# Altium PCB WizPoE-IO-V001.PcbDoc
Units mm, origin at the board's own origin, x right, y up, seen from the top; angles counter-clockwise.
Board outline 100 x 60 mm, 4 copper layers (Top Layer, Internal Plane 1 (Gnd), Internal Plane 2 (Vcc), Bottom Layer), stack 1.6 mm thick; 80 components, 81 nets, 365 pads, 272 vias.
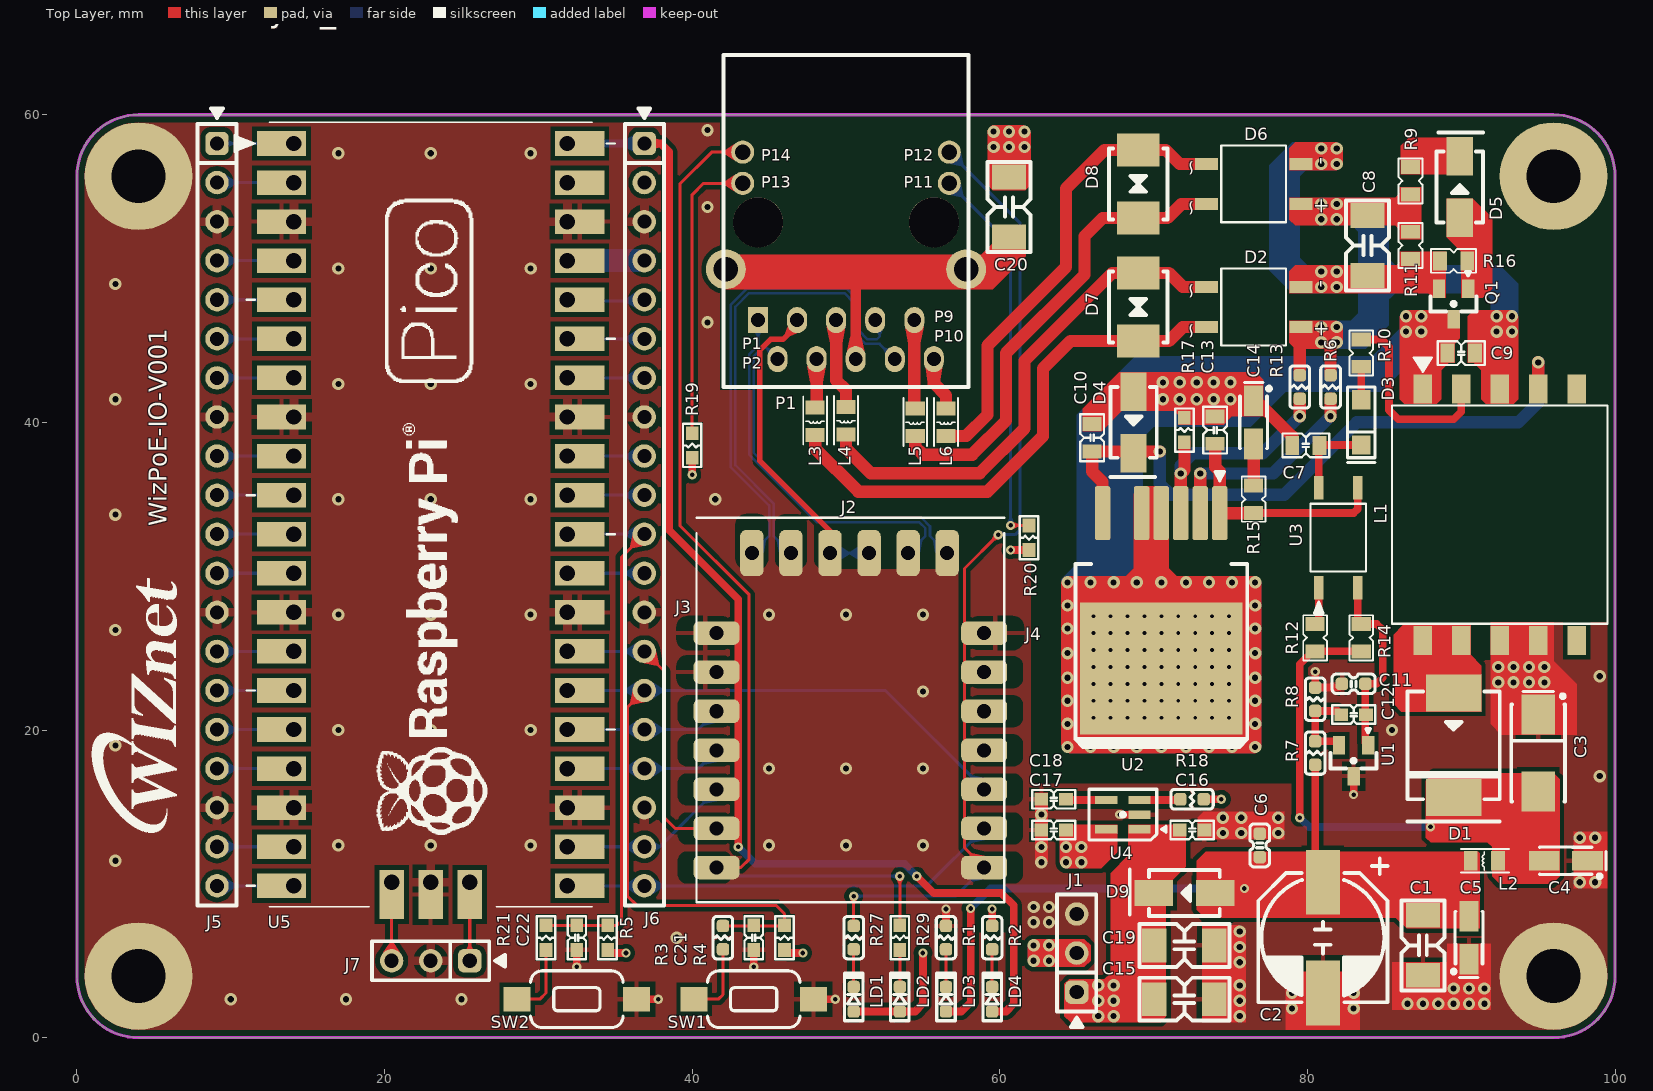
[diagram p0: Top Layer view]
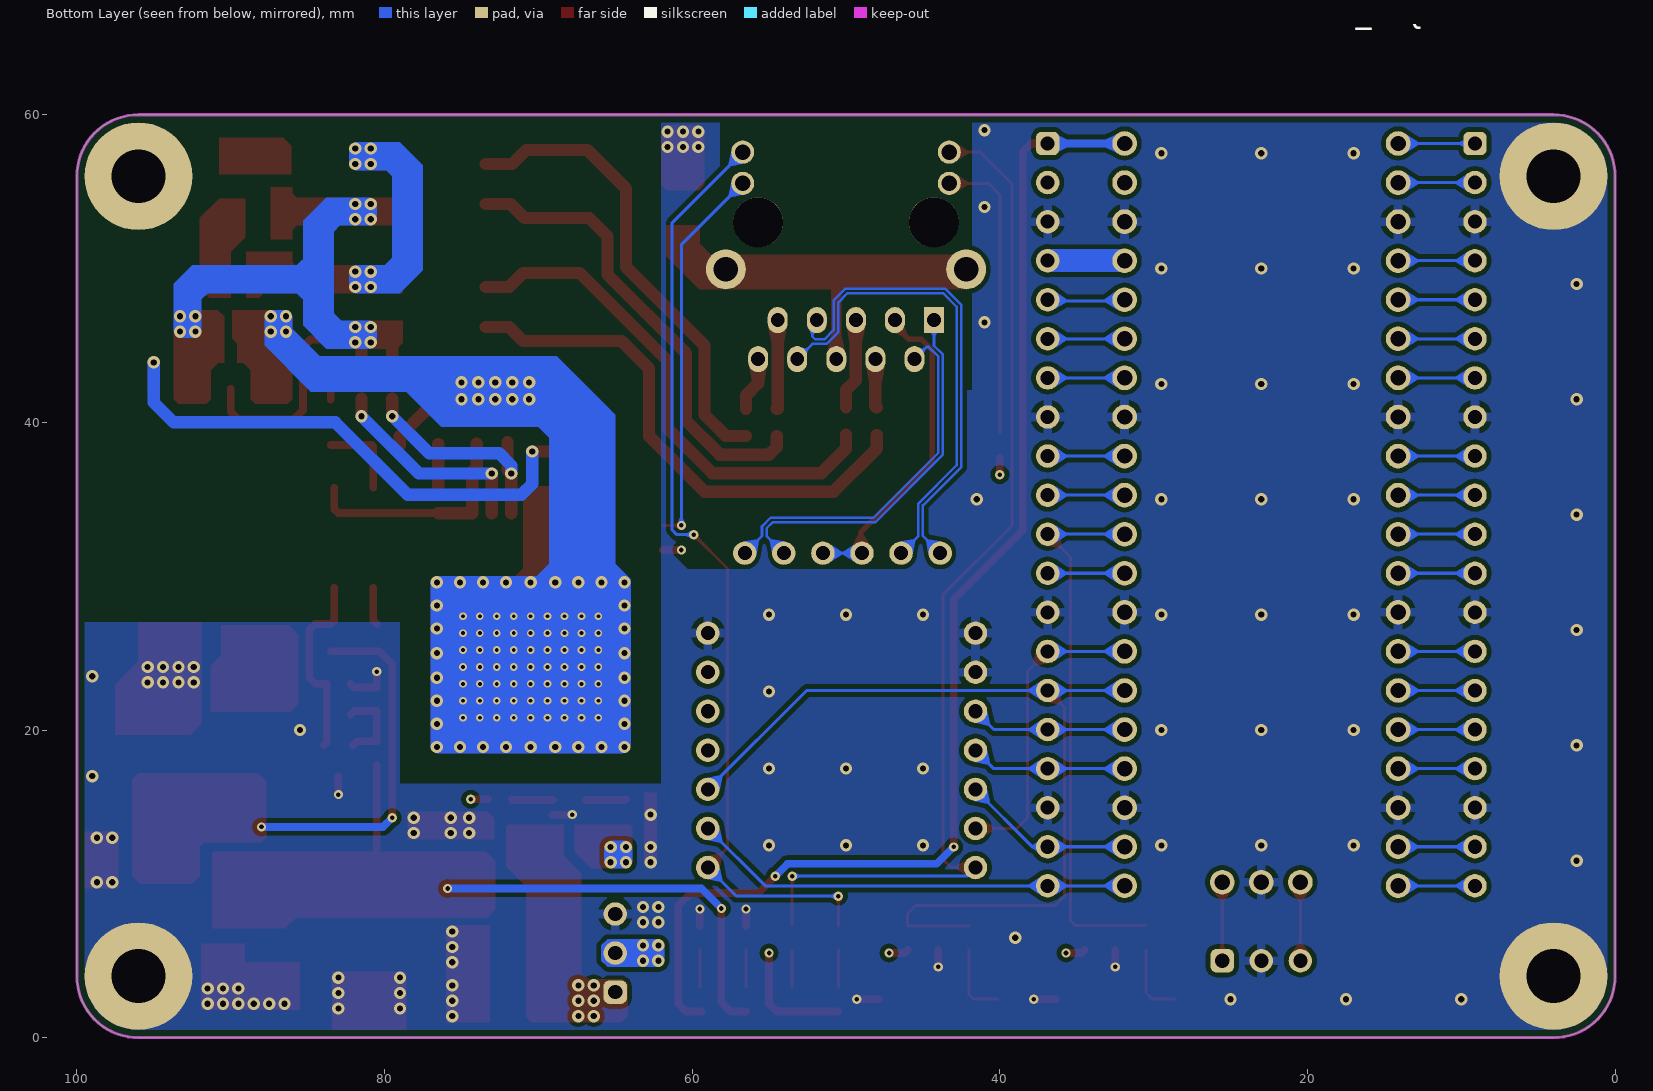
[diagram p1: Bottom Layer view, seen from below]
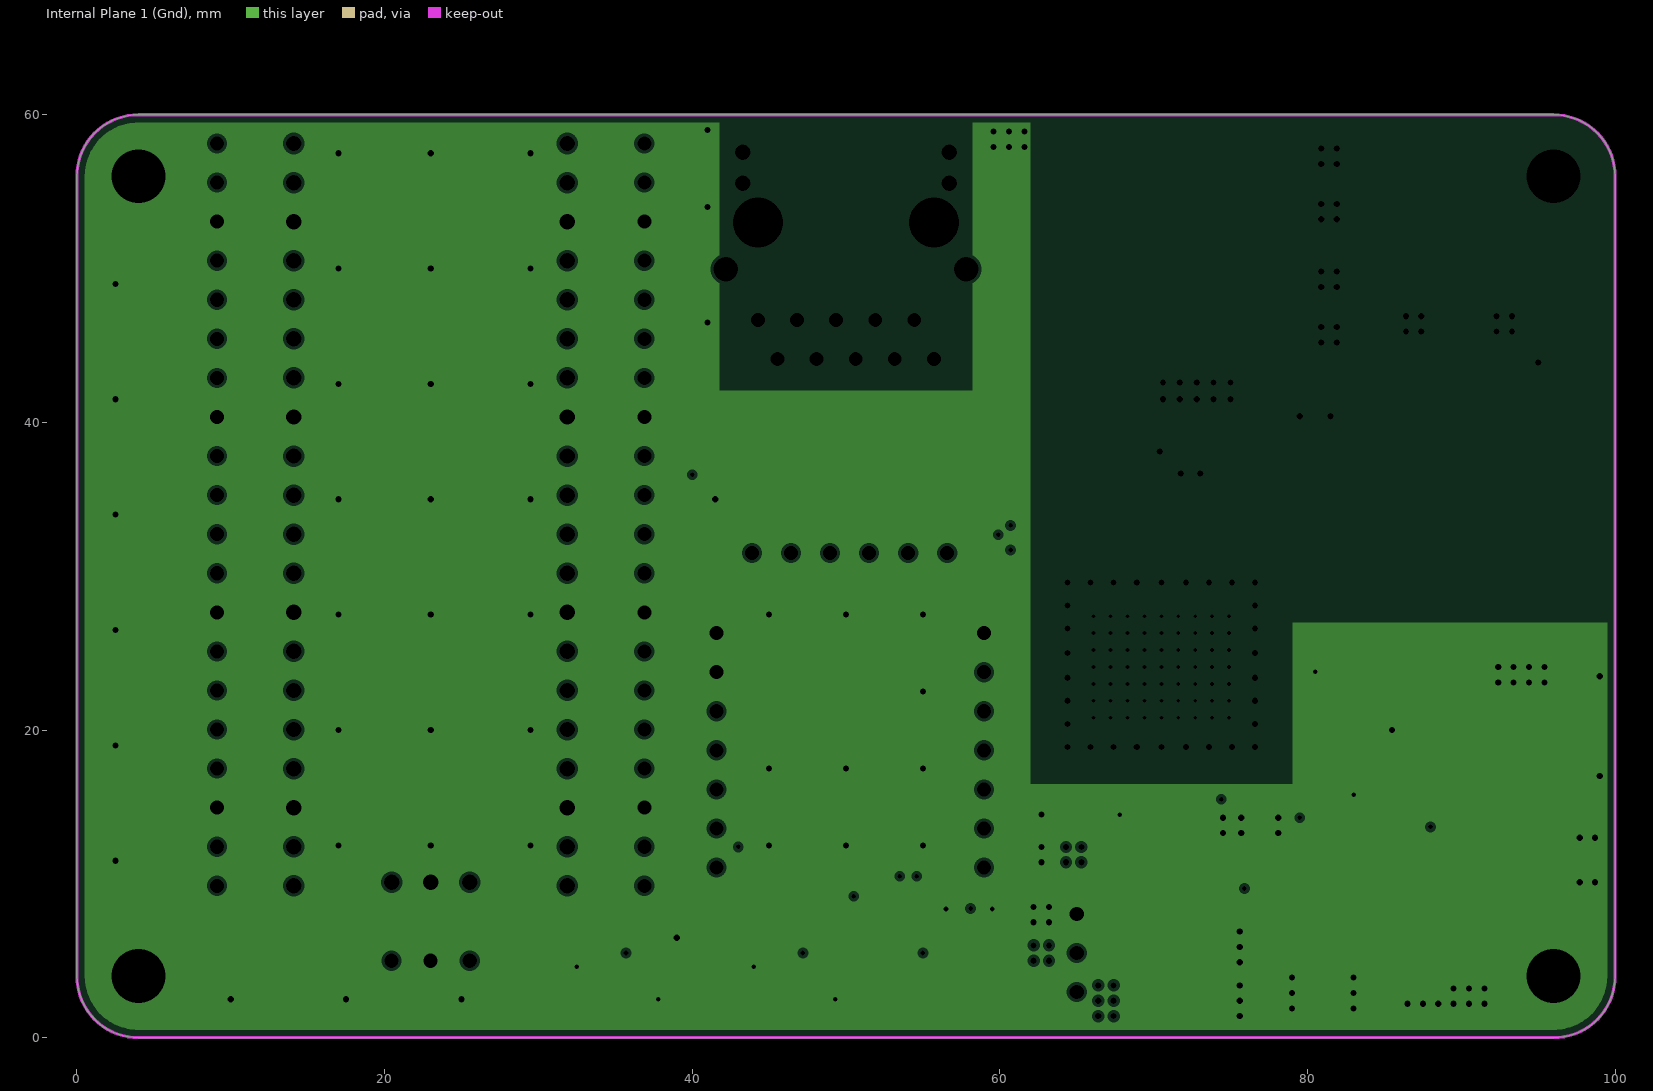
[diagram p2: Internal Plane 1 (Gnd), clearances drawn from the general rule]
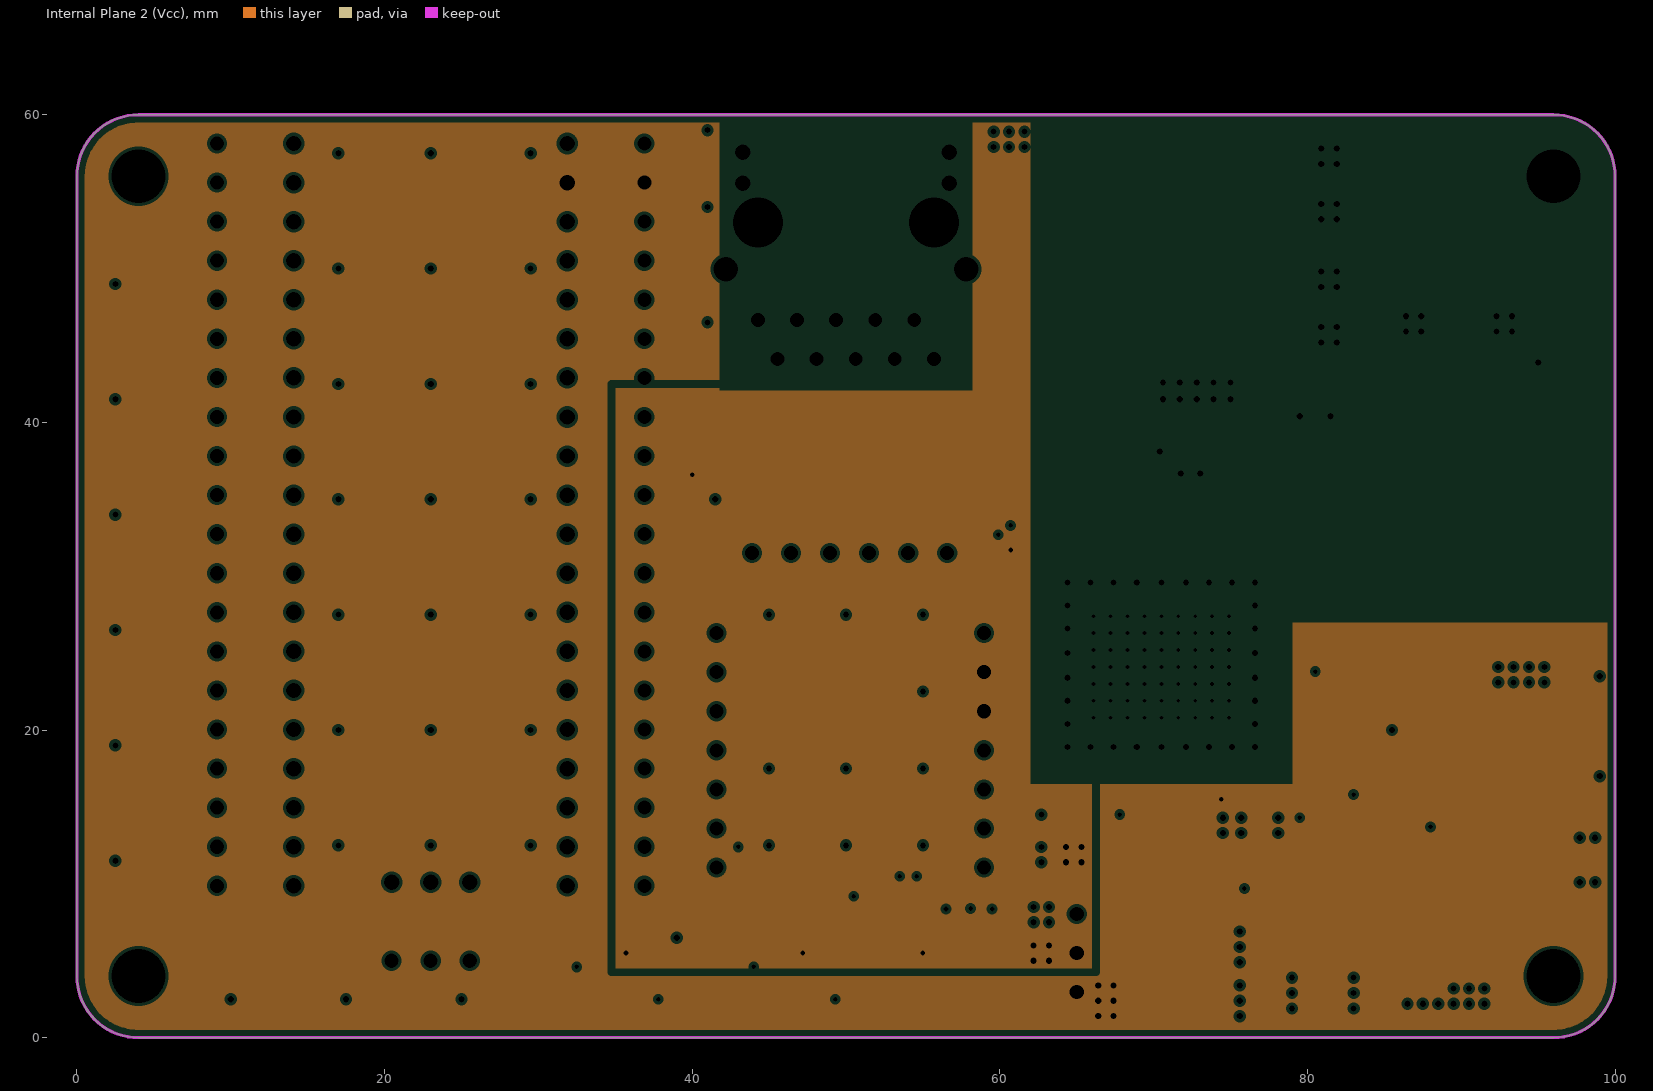
[diagram p3: Internal Plane 2 (Vcc), clearances drawn from the general rule]

## Layer stack, top to bottom
Top Solder: solder mask 0.01, Solder Resist, Dk 3.5
Top Layer: signal copper 0.1
Dielectric1: prepreg 0.4, FR-4, Dk 4.8
Internal Plane 1 (Gnd): plane copper 0.1, net GND
Dielectric 1: prepreg 0.4, PP-006, Dk 4.1
Internal Plane 2 (Vcc): plane copper 0.1, net (Multiple Nets)
Dielectric 2: prepreg 0.4, PP-006, Dk 4.1
Bottom Layer: signal copper 0.1
Bottom Solder: solder mask 0.01, Solder Resist, Dk 3.5

## Board outline
0,4 ccw(c4,4) 4,0 96,0 ccw(c96,4) 100,4 100,56 ccw(c96,56) 96,60 4,60 ccw(c4,56) 0,56

## Design rules (kind name [scope] priority, off if disabled: settings)
BoardOutlineClearance [All] p1: gap=0.5 ignorepadtopadclearanceinfootprint=FALSE
Clearance Pair [InNetClass('Pair')] p1: gap=0.2 ignorepadtopadclearanceinfootprint=FALSE except(0.1: Track-Track; 0.3: Arc-Poly Track-Poly SMDPad-Poly THPad-Poly Via-Poly Fill-Poly Poly-Poly Poly-Region Poly-Text)
Clearance [All] p2: gap=0.2 ignorepadtopadclearanceinfootprint=FALSE except(0.3: Arc-Poly Track-Poly SMDPad-Poly THPad-Poly Via-Poly Fill-Poly Poly-Poly Poly-Region Poly-Text)
DiffPairsRouting [All] p1: maxlimit=0.135 minlimit=0.135 mostfreqgap=0.135 toplayer_minwidth=0.165 toplayer_maxwidth=0.165 toplayer_prefwidth=0.165 bottomlayer_minwidth=0.165 bottomlayer_maxwidth=0.165 bottomlayer_prefwidth=0.165 maxuncoupledlength=15.24
HoleSize [All] p1: absolutevalues=TRUE maxlimit=4.064 minlimit=0.025 maxpercent=80.000 minpercent=20.000
PlaneClearance [All] p1: clearance=0.2
PlaneConnect [All] p1: planeconnectstyle=Direct reliefexpansion=0.508 reliefentries=4 reliefconductorwidth=0.254 reliefairgap=0.254
PolygonConnect [All] p1: thpad.connectstyle=Relief thpad.reliefconductorwidth=0.6 thpad.reliefentries=4 thpad.polygonreliefangle="90 Angle" thpad.airgapwidth=0.35 smdpad.connectstyle=Relief smdpad.reliefconductorwidth=0.3 smdpad.reliefentries=4 smdpad.polygonreliefangle="90 Angle" smdpad.airgapwidth=0.35 via.connectstyle=Direct via.reliefconductorwidth=0.254 via.reliefentries=4 via.polygonreliefangle="90 Angle" via.airgapwidth=0.254
RoutingVias [All] p1: holewidth=0.3 width=0.6 viastyle="Through Hole" minholewidth=0.25 minwidth=0.5 maxholewidth=0.5 maxwidth=0.8
SolderMaskExpansion [All] p1: expansion=0 istentingtop=FALSE
Width [All] p1: maxlimit=2 minlimit=0.1 preferedwidth=0.2 minimp=50.000000 maximp=50.000000 favimp=50.000000
26 further rules are at their usual default settings.

## Classes and differential pairs
net class Pair: RX_N RX_P TX_N TX_P
differential pair TX: +TX_P -TX_N
differential pair RX: +RX_P -RX_N

## Components (designator, comment, footprint, x,y, rotation, side; value= is the part's Value field where it differs from the comment)
C1 "10uF / 16V" CAP-1808 87.5,6 r270 top
C2 "470uF / 16V" CAP-8.3EC 81,6.5 r0 top
C3 "330uF,6V" C6032TT(C) 95,18.5 r270 top
C4 "10uF,10V" C3216TT(A) 96.8,11.5 r180 top
C5 "330uF,6V" C3216TT(A) 90.5,6.5 r90 top
C6 "1uF,10V" CAP-0603#1 76.9,12.5 r270 top
C7 "1uF/50V" CAP-0805 79.9,38.5 r180 top
C8 "CAP-1808" CAP-1808 83.9,51.5 r90 top
C9 "1uF, 100V" CAP-0805 90,44.5 r0 top
C10 "47pF,200V" CAP-0805 66,39 r270 top
C11 "0.33uF,50V" CAP-0603#1 83,23 r180 top
C12 "0.1uF,50V" CAP-0603#2 83,21 r180 top
C13 "0.1uF/50V" CAP-0805 74,39.5 r270 top
C14 "22uF,10V" C3216TT(A) 76.5,40 r270 top
C15 "NC/100uF" CAP-1808 72,2.5 r180 top
C16 "1uF" CAP-0603#2 72.5,13.5 r180 top
C17 "1uF" CAP-0603#2 63.5,13.5 r0 top
C18 "0.1uF" CAP-0603#2 63.5,15.5 r0 top
C19 "NC/100uF" CAP-1808 72,6 r180 top
C20 "1nF/2KV" CAP-1808 60.6,54 r90 top
C21 "0.1uF" CAP-0603#2 44,6.5 r90 top
C22 "0.1uF" CAP-0603#2 32.5,6.5 r90 top
D1 "RBR5L40A" DO-214AB/SMC 89.5,19 r270 top
D2 "MBS6" TO-269AA(MBS) 76.5,47.5 r270 top
D3 "BAV19" SOD-123(1-C,2-A) 83.5,40 r270 top
D4 "SMAJ150A" DO-214AC/SMA 68.7,40 r270 top
D5 "SMAJ12" DO-214AC/SMA 89.9,55.3 r90 top
D6 "MBS6" TO-269AA(MBS) 76.5,55.5 r270 top
D7 "SMBJ58CA (SMB)" DO-214AA/SMB(TVS) 69,47.5 r270 top
D8 "SMBJ58CA (SMB)" DO-214AA/SMB(TVS) 69,55.5 r270 top
D9 "SS14" DO-214AC/SMA 72,9.4 r180 top
J1 "Header_3P" IDC-1X3 65,5.5 r90 top
J2 "2.54mm 1x6 Pin Header DIP" IDC-1X6 56.58,31.5 r180 top
J3 "2.54mm 1x7 Pin Header DIP" IDC-1X7 41.58,26.3 r270 top
J4 "2.54mm 1x7 Pin Header DIP" IDC-1X7-1 58.98,26.3 r270 top
J5 "Pin Header Dip 20x1_2.54mm" IDC-1X20 9.11,58.13 r270 top
J6 "Pin Header Dip 20x1_2.54mm" IDC-1X20 36.89,58.13 r270 top
J7 "Header_3P" IDC-1X3 23,5 r180 top
L1 "SM13117EL" SM13117EL 92.5,34 r0 top
L2 "1uH, 2A" IND-0805 91.5,11.5 r180 top
L3 "MMZ2012S102A" IND-0805 47.995,40.073 r270 top
L4 "MMZ2012S102A" IND-0805 50,40.1 r270 top
L5 "MMZ2012S102A" IND-0805 54.5,40 r270 top
L6 "MMZ2012S102A" IND-0805 56.5,40 r270 top
LD1 "LED-0603" LED-0603-RED 50.5,2.5 r90 top
LD2 "LED-0603" LED-0603-RED 53.5,2.5 r90 top
LD3 "LED-0603" LED-0603-RED 56.5,2.5 r90 top
LD4 "LED-0603" LED-0603-RED 59.5,2.5 r90 top
P1 "RJC-191R" RJC-191R 50,53 r180 top
Q1 "Q-2N7002" SOT23-3L 89.5,47.7 r180 top
R1 "1.5K" RES-0603#1 56.5,6.5 r270 top
R2 "1.5K" RES-0603#1 59.5,6.5 r270 top
R3 "1K" RES-0603#1 42,6.5 r90 top
R4 "4.7k" RES-0603#2 46,6.5 r90 top
R5 "4.7k" RES-0603#2 34.5,6.5 r90 top
R6 "619k, 1%" RES-0603#1 81.5,42.3 r90 top
R7 "10k" RES-0603#1 80.5,18.5 r90 top
R8 "10k" RES-0603#1 80.5,22 r90 top
R9 "50k" RES-2012 86.7,55.7 r270 top
R10 "100R" RES-2012 83.5,44.5 r270 top
R11 "24.9k" RES-2012 86.7,51.5 r90 top
R12 "51R" RES-2012 80.5,26 r90 top
R13 "1M, 1%" RES-0603#1 79.5,42.3 r90 top
R14 "1k" RES-2012 83.5,26 r90 top
R15 "5.1R" RES-2012 76.5,35 r270 top
R16 "250k" RES-2012 89.5,50.5 r0 top
R17 "8.66k, 1%" RES-0603#2 72,39.5 r270 top
R18 "100K" RES-0603#1 72.5,15.5 r180 top
R19 "330R" RES-0603#2 40,38.5 r90 top
R20 "330R" RES-0603#2 61.9,32.5 r270 top
R21 "1K" RES-0603#2 30.5,6.5 r90 top
R27 "1K" RES-0603#1 50.5,6.5 r270 top
R29 "1K" RES-0603#2 53.5,6.5 r270 top
SW1 "ITS-1107(SMD)" IT-1107(SMD) 44,2.5 r0 top
SW2 "ITS-1107(SMD)" IT-1107(SMD) 32.5,2.5 r0 top
U1 "TL431ID" SOT23-3L 83,18 r180 top
U2 "DPA423-426" TO-263-7C 70.5,27.5 r180 top
U3 "PC357" PC357 82,32.5 r0 top
U4 "LM8805SF5-33V" SOT-23-5L 68,14.5 r180 top
U5 "PICO" PICO 23,34 r0 top

## Footprints (in the part's own frame and the unit in brackets; to place one, negate y for a bottom-side part, rotate by r counter-clockwise, add the part's x,y. Pads: shape width x height; smd on the part's side, far side on the other; paste and mask are expansions set on the pad)
C3216TT(A) [mm]
  rect 2x1.25 smd: 1(-1.4,0) 2(1.4,0)
  silkscreen extent -2.6,-0.9 1.7,1.12, body extent -1.6,-0.8 1.59,0.8
C6032TT(C) [mm]
  rect 2.6x2.2 smd: 1(-2.5,0) 2(2.5,0)
  silkscreen extent -4,-1.75 3.15,1.75, body extent -3,-1.6 3,1.6, height 2.51
CAP-8.3EC [mm]
  rect 2.2x4.2 smd: 1(0,-3.6) 2(0,3.6)
  silkscreen extent -4.2,-4.2 4.2,5.15, body extent -4.12,-4.65 4.18,4.65, height 10.31
CAP-0603#1 [mil] "Ceramic CAP 0603(1608)"
  rrect50% 32x32 smd: 1(-30,0) 2(30,0)
  silkscreen extent -55,-25 55,25, body extent -37,-16 37,16, height 32
CAP-0603#2 [mil] "Ceramic CAP 0603(1608)"
  rect 35.04x32.28 smd: 1(-31.5,0) 2(31.5,0)
  silkscreen extent -55,-24 55,24, body extent -37,-16 37,16, height 32
CAP-0805 [mil]
  rect 36x49 smd: 1(-35,0)
  rect 35.43x49 smd: 2(35,0)
  silkscreen extent -60,-30 60,30, body extent -39,-25 40,25, height 31
CAP-1808 [mm] "Ceramic CAP 1808(4520)"
  rect 1.6x2.2 smd: 1(-1.95,0) 2(1.95,0)
  silkscreen extent -2.92,-1.4 2.92,1.4, body extent -2.25,-1.02 2.25,1.01, height 2
DO-214AA/SMB(TVS) [mm]
  rect 2.159x2.743 smd: 1(-2.21,0) 2(2.21,0)
  silkscreen extent -2.3,-1.9 2.3,1.9, body extent -2.71,-1.8 2.69,1.8, height 2.27
DO-214AB/SMC [mm]
  rect 2.4x3.6 smd: 1(-3.4,0) 2(3.4,0)
  silkscreen extent -3.5,-3 4.95,3, body extent -3.98,-2.95 3.97,2.95, height 2.3
DO-214AC/SMA [mm]
  rect 2.5x1.7 smd: 1(-2,0) 2(2,0)
  silkscreen extent -2.3,-1.52 3.56,1.5, body extent -2.46,-1.27 2.47,1.27, height 2
IDC-1X3 [mil]
  rrect50% 60x60 hole 36: 1(-100,0)
  round 60 hole 36: 2(0,0) 3(100,0)
  silkscreen extent -190,-50 150,50, body extent -149,-49 151,51, height 336
IDC-1X6 [mil] "6-Way 2.54 mm Male Header"
  round 60 hole 36: 1(0,0) 2(100,0) 3(200,0) 4(300,0) 5(400,0) 6(500,0)
  rrect50% 60x118.11 smd: 1(0,0) 1(0,0) 2(100,0) 3(200,0) 4(300,0) 5(400,0) 6(500,0)
  body extent -49,-49 551,51, height 336
IDC-1X7 [mil]
  round 60 hole 36: 1(0,0) 2(100,0) 3(200,0) 4(300,0) 5(400,0) 6(500,0) 7(600,0)
  rrect50% 60x118.11 smd: 1(0,0) 1(0,0) 2(100,0) 3(200,0) 4(300,0) 5(400,0) 6(500,0) 7(600,0)
  body extent -49,-49 651,51, height 336
IDC-1X7-1 [mil]
  round 60 hole 36: 1(0,0) 2(100,0) 3(200,0) 4(300,0) 5(400,0) 6(500,0) 7(600,0)
  rrect50% 60x118.11 smd: 1(0,0) 1(0,0) 2(100,0) 3(200,0) 4(300,0) 5(400,0) 6(500,0) 7(600,0)
  body extent -49,-49 651,51, height 336
IDC-1X20 [mil]
  rrect50% 60x60 hole 36: 1(0,0)
  round 60 hole 36: 2(100,0) 3(200,0) 4(300,0) 5(400,0) 6(500,0) 7(600,0) 8(700,0) 9(800,0) 10(900,0) 11(1000,0) 12(1100,0) 13(1200,0) 14(1300,0) 15(1400,0) 16(1500,0) 17(1600,0) 18(1700,0) 19(1800,0) 20(1900,0)
  silkscreen extent -90,-50 1950,50, body extent -49,-49 1951,51, height 336
IND-0805 [mil]
  rect 36x49 smd: 1(-35,0)
  rect 35.43x49 smd: 2(35,0)
  Top Layer pour cut-out: -15,25 -15,-25 15,-25 15,25
  silkscreen extent -63,-30 60,30, body extent -39,-24 39,24, height 37
IT-1107(SMD) [mm]
  rect 1.75x1.6 smd: 1(-3.875,0) 2(3.875,0)
  silkscreen extent -3,-1.85 3,1.85, body extent -4,-1.8 4,1.8, height 2.6
LED-0603-RED [mm] "LED-0603-RED"
  rrect50% 0.8x0.8 smd: 1(-0.8,0) 2(0.8,0)
  silkscreen extent -1.4,-0.6 1.7,0.6, body extent -0.8,-0.4 0.8,0.4, height 0.78
PC357 [mm]
  rect 0.6x1.5 smd: 1(-1.27,-3.25) 2(1.27,-3.25) 3(1.27,3.25) 4(-1.27,3.25)
  silkscreen extent -1.8,-4.9 1.8,2.2
PICO [mm]
  rect 3.2x1.6 smd: 1(-9.69,24.13) 2(-9.69,21.59) 3(-9.69,19.05) 4(-9.69,16.51) 5(-9.69,13.97) 6(-9.69,11.43) 7(-9.69,8.89) 8(-9.69,6.35) 9(-9.69,3.81) 10(-9.69,1.27) 11(-9.69,-1.27) 12(-9.69,-3.81) 13(-9.69,-6.35) 14(-9.69,-8.89) 15(-9.69,-11.43) 16(-9.69,-13.97) 17(-9.69,-16.51) 18(-9.69,-19.05) 19(-9.69,-21.59) 20(-9.69,-24.13) 21(9.69,-24.13) 22(9.69,-21.59) 23(9.69,-19.05) 24(9.69,-16.51) 25(9.69,-13.97) 26(9.69,-11.43) 27(9.69,-8.89) 28(9.69,-6.35) 29(9.69,-3.81) 30(9.69,-1.27) 31(9.69,1.27) 32(9.69,3.81) 33(9.69,6.35) 34(9.69,8.89) 35(9.69,11.43) 36(9.69,13.97) 37(9.69,16.51) 38(9.69,19.05) 39(9.69,21.59) 40(9.69,24.13)
  round 1.6 hole 1: 1(-8.89,24.13) 2(-8.89,21.59) 3(-8.89,19.05) 4(-8.89,16.51) 5(-8.89,13.97) 6(-8.89,11.43) 7(-8.89,8.89) 8(-8.89,6.35) 9(-8.89,3.81) 10(-8.89,1.27) 11(-8.89,-1.27) 12(-8.89,-3.81) 13(-8.89,-6.35) 14(-8.89,-8.89) 15(-8.89,-11.43) 16(-8.89,-13.97) 17(-8.89,-16.51) 18(-8.89,-19.05) 19(-8.89,-21.59) 20(-8.89,-24.13) 21(8.89,-24.13) 22(8.89,-21.59) 23(8.89,-19.05) 24(8.89,-16.51) 25(8.89,-13.97) 26(8.89,-11.43) 27(8.89,-8.89) 28(8.89,-6.35) 29(8.89,-3.81) 30(8.89,-1.27) 31(8.89,1.27) 32(8.89,3.81) 33(8.89,6.35) 34(8.89,8.89) 35(8.89,11.43) 36(8.89,13.97) 37(8.89,16.51) 38(8.89,19.05) 39(8.89,21.59) 40(8.89,24.13) D1(-2.54,-23.9) D2(0,-23.9) D3(2.54,-23.9)
  rect 1.6x3.2 smd: D1(-2.54,-24.7) D2(0,-24.7) D3(2.54,-24.7)
  silkscreen extent -12.75,-25.5 11.97,25.5, body extent -10.5,-25.47 10.5,26.96, height 3.69
RES-0603#1 [mil] "RES-0603"
  rrect50% 32x32 smd: 1(-30,0) 2(30,0)
  silkscreen extent -54,-25 54,25, body extent -31,-16 32,16, height 18
RES-0603#2 [mil] "RES-0603"
  rect 35.04x32.28 smd: 1(-31.5,0) 2(31.5,0)
  silkscreen extent -55,-24 55,24, body extent -32,-16 32,16, height 18
RES-2012 [mil]
  rect 36x49 smd: 1(-35,0)
  rect 35.43x49 smd: 2(35,0)
  silkscreen extent -58,-30 58,30, body extent -40,-25 39,25, height 31
RJC-191R [mm]
  rect 1.3x1.7 hole 0.9: P1(5.72,6.35)
  oval 1.3x1.7 hole 0.9: P2(4.45,8.89) P3(3.18,6.35) P4(1.91,8.89) P5(0.64,6.35) P6(-0.63,8.89) P7(-1.9,6.35) P8(-3.17,8.89) P9(-4.44,6.35) P10(-5.71,8.89)
  round 1.5 hole 1.02: P11(-6.715,-2.54) P12(-6.715,-4.57) P13(6.715,-2.54) P14(6.715,-4.57)
  round 2.6 hole 1.6: S1(-7.815,3.05) S2(7.815,3.05)
  round 3.25 hole 3.25 unplated: ""(-5.715,0) ""(5.715,0)
  silkscreen extent -7.98,-10.89 7.98,10.71, body extent -7.98,-10.89 7.98,10.71, height 23.35
SM13117EL [mm]
  rect 1.2x1.88 smd: 1(-5,8.18) 2(-2.5,8.18) 3(0,8.18) 4(2.5,8.18) 5(5,8.18) 6(5,-8.18) 7(2.5,-8.18) 8(0,-8.18) 9(-2.5,-8.18) 10(-5,-8.18)
  silkscreen extent -7,-7.1 7,10.22, body extent -6.75,-9 6.75,9, height 12.8
SOD-123(1-C,2-A) [mm]
  rect 1.25x1.22 smd: 1(1.475,0) 2(-1.475,0)
  silkscreen extent -2.3,-0.9 2.6,0.9, body extent -1.91,-0.88 1.94,0.82, height 1.42
SOT23-3L [mm]
  rect 0.8x1.2 smd paste-0.07: 1(-0.95,-1) 2(0.95,-1) 3(0,1)
  silkscreen extent -1.5,-2.1 1.5,0.5, body extent -1.45,-1.4 1.45,1.4, height 1.28
SOT-23-5L [mm]
  rect 1.45x0.55 smd: 1(-1.075,0.95) 2(-1.075,0) 3(-1.075,-0.95) 4(1.075,-0.95) 5(1.075,0.95)
  silkscreen extent -2.8,-1.65 2.2,1.65, body extent -1.4,-1.45 1.4,1.45, height 1.45
TO-263-7C [mm]
  rrect25% 1x3.5 smd: 1(-3.8,-6.6) 2(-2.53,-6.6) 3(-1.26,-6.6) 4(0.01,-6.6) 5(1.28,-6.6) 7(3.82,-6.6)
  rect 10.55x8.6 smd: 4(0,3.5)
  silkscreen extent -5.59,-9.3 5.59,8.61, body extent -5,-7.78 5,7.89, height 4.78
TO-269AA(MBS) [mm]
  rect 0.8x1.5 smd: AC1(1.3,-3.075) AC2(-1.3,-3.075) NEG(-1.3,3.075) POS(1.3,3.075)
  silkscreen extent -2.5,-2.1 2.5,2.1, body extent -2.47,-3.52 2.47,3.52, height 2.7

## Part data
C1 C15 C19 C20: library part CAP-1808, "MLCC-1808(4520)"
C2: library part "AL-CAP-D 8.0mm_SMD", "AL-CAP D: 8.0mm SMD", Capacitance=10uF, Case Code (Imperial)=1206, Case Code (Metric)=3216, Dielectric Material=Tantalum, ESR (Equivalent Series Resistance)=4R, Leakage Current=1uA, Max Operating Temperature=125°C, Min Operating Temperature=-55°C, Package Quantity=2000, Tolerance=20%, Voltage=10V, Case/Package=1206, Construction=Flat, Depth=1.6mm, Dissipation Factor=6%, Features="General Purpose", Height=1.6mm, Height - Seated (Max)=0.071inch, Lead Free="Lead Free", Lead Pitch=1.2mm, Length=3.2mm, Life (Hours)=2000Hour, Mount="Surface Mount", Number of Pins=2, Packaging="Tape and Reel", Polarity=Polar, Radiation Hardening=No, REACH SVHC="No SVHC", RoHS Compliant=Yes, Series=T491, Size=1.6mm, Termination=SMD/SMT, Voltage Rating=10V, Voltage Rating (DC)=10V, Weight=0.000571oz, Width=0.063inch
C3 C4 C5 C14: library part "TANTAL_CASE A(3216)", "TANTAL_CASE A(3216)", Capacitance=10uF, Case Code (Imperial)=1206, Case Code (Metric)=3216, Dielectric Material=Tantalum, ESR (Equivalent Series Resistance)=4R, Leakage Current=1uA, Max Operating Temperature=125°C, Min Operating Temperature=-55°C, Package Quantity=2000, Tolerance=20%, Voltage=10V, Case/Package=1206, Construction=Flat, Depth=1.6mm, Dissipation Factor=6%, Features="General Purpose", Height=1.6mm, Height - Seated (Max)=0.071inch, Lead Free="Lead Free", Lead Pitch=1.2mm, Length=3.2mm, Life (Hours)=2000Hour, Mount="Surface Mount", Number of Pins=2, Packaging="Tape and Reel", Polarity=Polar, Radiation Hardening=No, REACH SVHC="No SVHC", RoHS Compliant=Yes, Series=T491, Size=1.6mm, Termination=SMD/SMT, Voltage Rating=10V, Voltage Rating (DC)=10V, Weight=0.000571oz, Width=0.063inch
C6 C11 C12 C16 C17 C18 C21 C22: library part CAP-0603, "MLCC-0603(1608)"
C7 C9 C10 C13: library part CAP-0805, "MLCC-0805(2012)"
C8: "MLCC-1808(4520)"
D1 D4 D5: library part "DIODE-Shottky (SOD-323)", "Silicon Schottky Diode"
D2 D6: Package=None, Availability=Unavailable, MP=MBS6, Price=None
D3: library part DIODE-BAT60A, "Silicon Schottky Diode"
D7 D8: library part "DIODE-TVS (SMB)", Manufacturer="Vishay Semiconductor", Manufacturer Part Number=SMAJ58CA-E3/61, Operating Junction and Storage Temperature Range="-55 to 150 degC", ComponentLink1Description="Manufacturer URL", ComponentLink1URL=http://www.vishay.com/, ComponentLink2Description=Datasheet, ComponentLink2URL=http://www.vishay.com/docs/88390/smaj50a.pdf, ComponentLink3Description="Package Specification", ComponentLink3URL=http://www.vishay.com/docs/88390/smaj50a.pdf, DatasheetVersion=12/8/2013, ID (uA)=2, IFSM="40 A", Mounting Technology="Surface Mount", PackageDescription="2-Pin DO-214AC (SMA), Body 4.245 x 2.665 mm", PackageReference=DO-214AC-2, Packing="Tape and Reel", PartNumber=SMAJ58CA-E3/61, PPPM (W)="400, 300", RoHS=TRUE, VBR Bi-Directional (V)="6.4 to 231", VWM (V)=58
D9: library part "DIODE-Shottky SMA(DO-214AC)", "DIODE SCHOTTKY 40V 1A SMA", Forward Current=1A, Manufacturer="ON Semiconductor", Max Junction Temp=+125°C, Max Repetitive Reverse Voltage=40V, Max Surge Forward Current=40A, Package=403AE, Peak Reverse Current=0.2mA, Temperature="-65°C to +125°C", Temperature Range Low=-65°C, Automotive=No, Category=Diode, ComponentLink2Description=Datasheet, ComponentLink2URL=https://www.onsemi.com/pub/Collateral/SS19-D.PDF, Device Class L1="Discrete Semiconductors", Device Class L2=Diodes, Device Class L3="Schottky Diodes", Digikey Description="DIODE SCHOTTKY 40V 1A SMA", Height=2.5mm, Lead Free=Yes, Manufacturer Part Number=SS14, Mouser Description="Schottky Diodes & Rectifiers SMA 40V 1.0A", Octopart=https://octopart.com/ss14-on+semiconductor-29205033, RoHS=TRUE, Standoff Height=0.05mm, Temperature Range High=+125°C
J1 J7: library part "Pin Header 3x1_2.54mm", "THT Vertical Pin Header WR-PHD, Pitch 2.54 mm, Single Row, 3 pins", Contact Resistance=20mOhm, Manufacturer="Wurth Elektronik", Operating Temperature=-40to105degC, Package Reference=61300311121, Rated Current=3A, Withstanding Voltage=500VAC, Working Voltage=250VAC, Datasheet URL=https://katalog.we-online.de/em/datasheet/6130xx11121.pdf, Gender=Male, Manufacturer URL=http://www.we-online.de, Mounting Technology=THT, Orientation=Vertical, Packaging=Bag, Part Number=61300311121, Pin Number=3, Pitch=2.54mm, Publisher=WurthElektronik, Row Number=Single
J5 J6: library part "Pin Header 20x1_2.54mm", "THT Vertical Pin Header WR-PHD, Pitch 2.54 mm, Single Row, 20 pins", Contact Resistance=20mOhm, Manufacturer="Wurth Elektronik", Operating Temperature=-40to105degC, Package Reference=61302011121, Rated Current=3A, Withstanding Voltage=500VAC, Working Voltage=250VAC, Datasheet URL=https://katalog.we-online.de/em/datasheet/6130xx11121.pdf, Gender=Male, Manufacturer URL=http://www.we-online.de, Mounting Technology=THT, Orientation=Vertical, Packaging=Bag, Part Number=61302011121, Pin Number=20, Pitch=2.54mm, Publisher=WurthElektronik, Row Number=Single
L2: library part IND-0805, "Inductor 0805(2012)"
L3 L4 L5 L6: library part IND-0603, "Inductor 0603(1608)"
P1: "PoE RJ45"
Q1: "N-Channel 60-V (D-S) MOSFET"
R1 R2 R3 R4 R5 R21 R27 R29: library part RES-0603, "RES0603"
R6 R7 R8 R13 R17 R18 R19 R20: library part RES-0603, "Chip Resistor 0603(1608)", Case Code (Imperial)=0603, Case Code (Metric)=1608, Manufacturer=Yageo, Max Operating Temperature=155degC, Max Power Dissipation=100mW, Min Operating Temperature=-55degC, Package Description="2-Pin Surface Mount Device, Body 1.6 x 0.8 mm", Package Quantity=1, Resistance=1.5KOhm, Temperature Coefficient=100ppm/degreesC, Tolerance=1%, Voltage Rating=50V, Case/Package=0603, Composition=ThickFilm, Datasheet URL=http://www.yageo.com/NewPortal/yageodocoutput?fileName=/pdf/R-Chip/PYu-RC_Group_51_RoHS_L_5.pdf, Datasheet Version="Rev. 5, 10/2016", Depth=0.8mm, Height=0.022inch, Lead Free=LeadFree, Length=0.063inch, Manufacturer URL=http://www.yageo.com/, Military Standard=Not, Number of Pins=2, Number of Terminations=2, Package Reference=0603, Packaging=TapeandReel, Power Rating=100mW, REACH SVHC=NoSVHC, RoHSCompliant=true, Termination=SMD/SMT, Voltage Rating (DC)=50V, Width=0.031inch
R9 R10 R11 R12 R14 R15 R16: library part RES-2012, "Chip Resistor 0805(2012)"
SW1 SW2: "TACT Switch (SMD)"
U1: library part TL431IDBZT, "Adjustable precision shunt regulator 3-SOT-23 -40 to 85", Package="SOT-23-3 Texas Instruments", Availability=Warning, Check_prices=https://www.snapeda.com/parts/TL431IDBZT/Texas%20Instruments/view-part/1206577/?ref=eda, MF="Texas Instruments", MP=TL431IDBZT, Price=None, Purchase-URL=https://pricing.snapeda.com/search/part/TL431IDBZT/?ref=eda, SnapEDA_Link=https://www.snapeda.com/parts/TL431IDBZT/Texas%20Instruments/view-part/1206577/?ref=snap
U2: library part DPA423, "Highly Integrated DC-DC Converter ICs for Power over Ethernet & Telecom Applications"
U4: "600mA CMOS LDO Regulator"
U5: "Module", Manufacturer_Name=RASPBERRY-PI, Datasheet Link=https://datasheets.raspberrypi.org/pico/pico_datasheet.pdf, Height=1mm, Manufacturer_Part_Number=PICO

## Free pads (board coordinates)
  round 7 hole 3.5: 0(4,4) 0(4,56) 0(96,4) 0(96,56)
  round 0 on Mech16 paste+0 mask+0: 1(79.2,16.4) 1(82.4,35.9)

## Via types
v1: diameter 0.8, hole 0.4, Top Layer to Bottom Layer, tented both sides, 184 vias
v2: diameter 0.5, hole 0.25, Top Layer to Bottom Layer, tented both sides, 63 vias
v3: diameter 0.6, hole 0.3, Top Layer to Bottom Layer, tented both sides, 25 vias

## Nets (pads, with @x,y where several pads share a name; then routed paths per layer and width w, separated by ;. In a path a pad name is that pad's centre, name@x,y a point inside that pad or via, vN(x,y) a via of type N, cw(c..) or ccw(c..) an arc to the next point about the centre after c; other vN are vias at no path point)
3V3: C17.2 J1.2 J4.2 J4.3 LD1.1 LD2.1 R4.1 R5.1 R19.1 R20.2 U4.5 | length 12.9
  Top Layer w0.5: R5.1 34.7,5.5 v3(35.7,5.5) ; v3(40,36.6) R19.1 ; R4.1 46.2,5.5 v3(47.2,5.5) ; LD1.1 LD2.1 54.5,1.7 55,2.2 v3(55,5.5) ; v3(60.7,31.7) R20.2
  other v1: 62.2,5 63.2,5 62.2,6 63.2,6 64.3,11.4 65.3,11.4 64.3,12.4 65.3,12.4
3V3_EN: J6.4 U5.37 | length 5
  Bottom Layer w1.5: U5.37@31.89,50.51 J6.4
5V: C1.1 C2.2 C5.2 C6.2 D9.1 L2.2 LD3.1 R7.1 | length 34.1
  Top Layer w0.5: LD3.1 57.5,1.7 58.1,2.3 v3(58.1,8.4) ; R7.1 80.5,10.6 C2.2
  Bottom Layer w0.5: v3(58.1,8.4) 59.4,9.7 v3(75.9,9.7)
+VIN: C8.2 C9.2 D2.POS D6.POS L1.3 R6.2 R9.2 R11.2 R13.2 | length 6.3
  Top Layer w0.8: R13.2 79.5,45.2 v1(80.9,45.2) 81.5,45.2 R6.2
  other v1: 81.9,45.2 92.3,45.9 93.3,45.9 80.9,46.2 81.9,46.2 92.3,46.9 93.3,46.9 80.9,53.2 81.9,53.2 80.9,54.2 81.9,54.2
-VIN: C8.1 D2.NEG D6.NEG Q1.2 R11.1 R16.1
  other v1: 80.9,48.8 81.9,48.8 80.9,49.8 81.9,49.8 80.9,56.8 81.9,56.8 80.9,57.8 81.9,57.8
ACTn: J4.7 P1.P12 R27.1 | length 62.3
  Top Layer w0.2: R27.1 v3(50.5,9.2) ; J4.7@58.98,11.06 57.7,12.34 57.7,30.5 v3(59.9,32.7)
  Bottom Layer w0.2: v3(50.5,9.2) 57.12,9.2 J4.7@58.98,11.06 ; P1.P12 61.3,52.985 61.3,33 61,32.7 v3(59.9,32.7)
ADC_VREF: J6.6 U5.35 | length 5
  Bottom Layer w0.2: U5.35@31.89,45.43 J6.6
CGND: C20.1 P1.P6 P1.S1 P1.S2 | length 5.2
  Top Layer w0.7: P1.P6 50.63,49.27
CSn: J3.5 J6.19 U5.22 | length 11.3
  Bottom Layer w0.2: U5.22@31.89,12.41 J6.19 37.89,12.41 41.58,16.1 J3.5@41.58,16.14
GND: C1.2 C2.1 C3.1 C4.1 C5.1 C6.1 C11.2 C15.1 C16.1 C17.1 C18.1 C19.1 C20.2 C21.1 C22.1 J1.3 J3.1 J3.2 J4.1 J5.3 J5.8 J5.13 J5.18 J6.3 J6.8 J6.13 J6.18 J7.2 L1.7 L1.8 pad.0@4,4 pad.0@4,56 pad.0@96,4 R1.1 R2.1 R8.2 SW1.2 SW2.2 U1.3 U4.2 U5.3 U5.8 U5.13 U5.18 U5.23 U5.28 U5.33 U5.38 U5.D2 | length 12.6
  Top Layer w0.5: v3(32.5,4.6) C22.1 ; SW2.2 v3(37.8,2.5) ; v3(44,4.6) C21.1 ; SW1.2 v3(49.3,2.5) ; R1.1 v3(56.5,8.362) ; R2.1 v3(59.5,8.362) ; v3(67.8,14.5) U4.2 ; v3(80.5,23.8) R8.2 80.7,22.762 82,22.762 C11.2 ; v3(83,15.8) U1.3
  other v1: 75.6,1.4 79,1.9 83,1.9 86.5,2.2 87.5,2.2 88.5,2.2 89.5,2.2 90.5,2.2 91.5,2.2 75.6,2.4 10,2.5 17.5,2.5 25,2.5 79,2.9 83,2.9 89.5,3.2 90.5,3.2 91.5,3.2 75.6,3.4 79,3.9 83,3.9 75.6,4.9 75.6,5.9 39,6.5 75.6,6.9 62.2,7.5 63.2,7.5 62.2,8.5 63.2,8.5 97.7,10.1 98.7,10.1 62.7,11.4 2.5,11.5 62.7,12.4 17,12.5 23,12.5 29.5,12.5 45,12.5 50,12.5 55,12.5 97.7,13 98.7,13 74.5,13.3 75.7,13.3 78.1,13.3 74.5,14.3 75.7,14.3 78.1,14.3 62.7,14.5 99,17 45,17.5 50,17.5 55,17.5 2.5,19 17,20 23,20 29.5,20 85.5,20 55,22.5 92.4,23.1 93.4,23.1 94.4,23.1 95.4,23.1 99,23.5 92.4,24.1 93.4,24.1 94.4,24.1 95.4,24.1 2.5,26.5 17,27.5 23,27.5 29.5,27.5 45,27.5 50,27.5 55,27.5 2.5,34 17,35 23,35 29.5,35 41.5,35 2.5,41.5 17,42.5 23,42.5 29.5,42.5 41,46.5 2.5,49 17,50 23,50 29.5,50 41,54 17,57.5 23,57.5 29.5,57.5 59.6,57.9 60.6,57.9 61.6,57.9 59.6,58.9 60.6,58.9 61.6,58.9 41,59
GPIO0: J5.1 U5.1 | length 5
  Bottom Layer w0.2: J5.1 U5.1@14.11,58.13
GPIO1: J5.2 U5.2 | length 5
  Bottom Layer w0.2: J5.2 U5.2@14.11,55.59
GPIO2: J5.4 U5.4 | length 5
  Bottom Layer w0.2: J5.4 U5.4@14.11,50.51
GPIO3: J5.5 U5.5 | length 5
  Bottom Layer w0.2: J5.5 U5.5@14.11,47.97
GPIO4: J5.6 U5.6 | length 5
  Bottom Layer w0.2: J5.6 U5.6@14.11,45.43
GPIO5: J5.7 U5.7 | length 5
  Bottom Layer w0.2: J5.7 U5.7@14.11,42.89
GPIO6: J5.9 U5.9 | length 5
  Bottom Layer w0.2: J5.9 U5.9@14.11,37.81
GPIO7: J5.10 U5.10 | length 5
  Bottom Layer w0.2: J5.10 U5.10@14.11,35.27
GPIO8: J5.11 U5.11 | length 5
  Bottom Layer w0.2: J5.11 U5.11@14.11,32.73
GPIO9: J5.12 U5.12 | length 5
  Bottom Layer w0.2: J5.12 U5.12@14.11,30.19
GPIO10: J5.14 U5.14 | length 5
  Bottom Layer w0.2: J5.14 U5.14@14.11,25.11
GPIO11: J5.15 U5.15 | length 5
  Bottom Layer w0.2: J5.15 U5.15@14.11,22.57
GPIO12: J5.16 U5.16 | length 5
  Bottom Layer w0.2: J5.16 U5.16@14.11,20.03
GPIO13: J5.17 U5.17 | length 5
  Bottom Layer w0.2: J5.17 U5.17@14.11,17.49
GPIO14: J5.19 U5.19 | length 5
  Bottom Layer w0.2: J5.19 U5.19@14.11,12.41
GPIO15: J5.20 U5.20 | length 5
  Bottom Layer w0.2: J5.20 U5.20@14.11,9.87
GPIO16: J4.6 J6.20 U5.21 | length 28.6
  Bottom Layer w0.2: U5.21@31.89,9.87 J6.20 55.25,9.87 J4.6@58.98,13.6
GPIO18: J3.4 J6.17 U5.24 | length 10.2
  Bottom Layer w0.2: U5.24@31.89,17.49 J6.17 40.39,17.49 J3.4@41.58,18.68
GPIO19: J3.3 J6.16 U5.25 | length 10.2
  Bottom Layer w0.2: U5.25@31.89,20.03 J6.16 40.39,20.03 J3.3@41.58,21.22
GPIO20: C21.2 J4.5 J6.15 R3.2 R4.2 U5.26 | length 59
  Top Layer w0.2: J6.15 35.8,21.48 35.8,9.2 36.4,8.6 45.45,8.6 46,8.05 R4.2 45.962,7.262 R3.2
  Bottom Layer w0.2: U5.26@31.89,22.57 J6.15 52.55,22.57 J4.5@58.98,16.14
GPIO21: J3.6 J6.14 U5.27 | length 20
  Top Layer w0.2: J6.14 38.2,23.8 38.2,14.3 38.9,13.6 J3.6@41.58,13.6
  Bottom Layer w0.2: U5.27@31.89,25.11 J6.14
GPIO22: J6.12 U5.29 | length 5
  Bottom Layer w0.2: U5.29@31.89,30.19 J6.12
GPIO26/ADC0: J6.10 U5.31 | length 5
  Bottom Layer w0.2: U5.31@31.89,35.27 J6.10
GPIO27/ADC1: J6.9 U5.32 | length 5
  Bottom Layer w0.2: U5.32@31.89,37.81 J6.9
GPIO28/ADC2: J6.7 U5.34 | length 5
  Bottom Layer w0.2: U5.34@31.89,42.89 J6.7
LINKn: J3.7 P1.P14 R29.1 | length 68.4
  Top Layer w0.2: J3.7@41.58,11.06 43.16,11.06 43.7,11.6 43.7,28.8 39.2,33.3 39.2,55.5 41.27,57.57 P1.P14 ; R29.1 v3(53.5,10.5)
  Bottom Layer w0.2: J3.7@41.58,11.06 42.14,10.5 v3(53.5,10.5)
NetC3_2: C3.2 C4.2 D1.2 L2.1 R12.1 R14.1 | length 23.1
  Top Layer w0.5: v3(79.5,14.3) 79.5,24.276 80.335,25.111 R12.1 R14.1
  Bottom Layer w0.5: v3(79.5,14.3) 80.1,13.7 v3(88,13.7)
NetC7_1: C7.1 D3.1 U3.4 | length 5.5
  Top Layer w0.5: U3.4 80.73,38.441 C7.1 80.814,38.525 D3.1
NetC7_2: C7.2 C9.1 C10.1 C13.1 C14.1 D4.1 L1.1 Q1.3 R17.1 U2.4 U2.5 | length 4.1
  Top Layer w0.8: C14.1 76.7,41.4 79.011,39.089 C7.2
  other v1: 64.4,18.9 65.9,18.9 67.4,18.9 68.9,18.9 70.5,18.9 72.1,18.9 73.6,18.9 75.1,18.9 76.6,18.9 64.4,20.4 76.6,20.4 64.4,21.9 76.6,21.9 64.4,23.4 76.6,23.4 64.4,25 76.6,25 64.4,26.6 76.6,26.6 64.4,28.1 76.6,28.1 64.4,29.6 65.9,29.6 67.4,29.6 68.9,29.6 70.5,29.6 72.1,29.6 73.6,29.6 75.1,29.6 76.6,29.6 70.6,41.5 71.7,41.5 72.8,41.5 73.9,41.5 75,41.5 70.6,42.6 71.7,42.6 72.8,42.6 73.9,42.6 75,42.6 86.4,45.9 87.4,45.9 86.4,46.9 87.4,46.9
  other v2: 66.1,20.8 67.2,20.8 68.3,20.8 69.4,20.8 70.5,20.8 71.6,20.8 72.7,20.8 73.8,20.8 74.9,20.8 66.1,21.9 67.2,21.9 68.3,21.9 69.4,21.9 70.5,21.9 71.6,21.9 72.7,21.9 73.8,21.9 74.9,21.9 66.1,23 67.2,23 68.3,23 69.4,23 70.5,23 71.6,23 72.7,23 73.8,23 74.9,23 66.1,24.1 67.2,24.1 68.3,24.1 69.4,24.1 70.5,24.1 71.6,24.1 72.7,24.1 73.8,24.1 74.9,24.1 66.1,25.2 67.2,25.2 68.3,25.2 69.4,25.2 70.5,25.2 71.6,25.2 72.7,25.2 73.8,25.2 74.9,25.2 66.1,26.3 67.2,26.3 68.3,26.3 69.4,26.3 70.5,26.3 71.6,26.3 72.7,26.3 73.8,26.3 74.9,26.3 66.1,27.4 67.2,27.4 68.3,27.4 69.4,27.4 70.5,27.4 71.6,27.4 72.7,27.4 73.8,27.4 74.9,27.4
NetC10_2: C10.2 D4.2 L1.4 U2.7 | length 42.5
  Top Layer w0.8: U2.7 66.68,36.12 66,36.8 C10.2 v1(70.4,38.111) ; L1.4 v1(95,43.9)
  Bottom Layer w0.8: v1(70.4,38.111) 70.4,36 71.1,35.3 78.5,35.3 83.2,40 93.7,40 95,41.3 v1(95,43.9)
NetC11_1: C11.1 C12.1 R14.2 U1.1 U3.2 | length 12.5
  Top Layer w0.5: U3.2 83.27,27.119 R14.2 84.511,26.889 84.9,26.5 84.9,23.4 84.5,23 C11.1 83.762,19.188 U1.1
NetC12_2: C12.2 R7.2 R8.1 U1.2 | length 5.4
  Top Layer w0.5: U1.2 81.788,19.262 R7.2 R8.1 81.962,21.238 C12.2
NetC13_2: C13.2 R15.2 U2.1 U3.3 | length 15.1
  Top Layer w0.5: R15.2 83.011,34.111 83.27,34.37 U3.3
  Top Layer w0.8: C13.2 74,37.1 74.3,36.8 U2.1 76.489,34.1 R15.2
NetC14_2: C14.2 R15.1 | length 2.7
  Top Layer w0.8: R15.1 C14.2
NetC18_2: C18.2 U4.4 | length 2.6
  Top Layer w0.5: C18.2 64.35,15.45 U4.4
NetD1_1: D1.1 L1.9 L1.10
NetD3_2: D3.2 R10.2 | length 2.1
  Top Layer w0.5: D3.2 R10.2
NetD5_1: D5.1 Q1.1 R16.2
NetD5_2: D5.2 R9.1
NetJ6_5: J6.5 U5.36 | length 5
  Bottom Layer w0.2: U5.36@31.8,47.9 J6.5@36.8,47.9
NetJ7_1: J7.1 U5.D3 | length 5.1
  Top Layer w0.2: J7.1 25.54,9.3 U5.D3@25.54,10.1
NetJ7_3: J7.3 U5.D1 | length 4.3
  Top Layer w0.2: J7.3 U5.D1@20.46,9.3
NetL1_2: L1.2 R10.1 | length 12.7
  Top Layer w0.5: R10.1 84.811,45.389 85.3,44.9 85.3,40.8 85.9,40.2 89.5,40.2 90,40.7 L1.2
NetL3_1: L3.1 P1.P4 | length 3.2
  Top Layer w0.8: L3.1 48.09,41.057 P1.P4
NetL4_1: L4.1 P1.P5 | length 5.9
  Top Layer w0.8: P1.P5 49.36,42.74 50,42.1 L4.1
NetL5_1: L5.1 P1.P9 | length 5.8
  Top Layer w0.8: L5.1@54.44,40.889 P1.P9
NetL6_1: L6.1 P1.P10 | length 3.5
  Top Layer w0.8: P1.P10 55.71,42.54 56.5,41.75 L6.1
NetLD1_2: LD1.2 R27.2 | length 2.4
  Top Layer w0.2: LD1.2 R27.2
NetLD2_2: LD2.2 R29.2 | length 2.4
  Top Layer w0.2: LD2.2 R29.2
NetLD3_2: LD3.2 R1.2 | length 2.4
  Top Layer w0.2: LD3.2 R1.2
NetLD4_2: LD4.2 R2.2 | length 2.4
  Top Layer w0.2: LD4.2 R2.2
NetP1_P11: P1.P11 R20.1 | length 25.1
  Top Layer w0.2: v3(60.7,33.3) R20.1
  Bottom Layer w0.2: P1.P11 60.7,51.555 v3(60.7,33.3)
NetP1_P13: P1.P13 R19.2 | length 19.1
  Top Layer w0.2: R19.2 40,40.2 40,54.8 40.74,55.54 P1.P13
NetR3_1: R3.1 SW1.1 | length 4.9
  Top Layer w0.2: SW1.1 41.7,2.5 42,2.8 R3.1
NetR6_1: R6.1 U2.2 | length 13.7
  Top Layer w0.8: U2.2 v1(73.03,36.67) ; v1(81.5,40.4) R6.1
  Bottom Layer w0.8: v1(73.03,36.67) 77.77,36.67 v1(81.5,40.4)
NetR12_2: R12.2 U3.1 | length 2.5
  Top Layer w0.5: R12.2 80.73,27.119 U3.1
NetR13_1: R13.1 R17.2 U2.3 | length 15.4
  Top Layer w0.8: U2.3 v1(71.76,36.67) 72,36.91 R17.2 ; v1(79.5,40.4) R13.1
  Bottom Layer w0.8: v1(71.76,36.67) 71.76,37.2 72.56,38 77.1,38 v1(79.5,40.4)
NetR18_2: R18.2 U4.3 | length 2.7
  Top Layer w0.5: U4.3 71.688,15.45 R18.2
NetR21_1: R21.1 SW2.1 | length 4.8
  Top Layer w0.2: SW2.1 30.1,2.5 30.5,2.9 R21.1
RCT: J2.3 J2.4 P1.P3 | length 21.2
  Top Layer w0.35: P1.P3 46.9,46.57 46.9,46.4 45.9,45.4 45.1,45.4 44.4,44.7 44.4,37.5 49.06,32.84 49.06,31.6 J2.4@48.96,31.5
  Bottom Layer w0.2: J2.4@48.96,31.5 J2.3@51.5,31.5
RUN: C22.2 J6.11 R5.2 R21.2 U5.30 | length 35.8
  Top Layer w0.2: R21.2 C22.2 R5.2 35.1,7.3 35.4,7.6 35.4,31.24 J6.11
  Bottom Layer w0.2: U5.30@31.89,32.73 J6.11
RX_N: J2.5 P1.P8 | length 31.1
  Bottom Layer w0.165: J2.5@46.42,31.5 45.3,32.62 45.3,34.724 42.8,37.224 42.8,47.5 43.7,48.4 49.9,48.4 50.5,47.8 50.5,45.876 51.276,45.1 52.18,45.1 P1.P8
RX_P: J2.6 P1.P7 | length 31.5
  Bottom Layer w0.165: J2.6@43.88,31.5 45,32.62 45,34.6 42.5,37.1 42.5,47.624 43.576,48.7 50.024,48.7 50.8,47.924 50.8,46 51.4,45.4 52,45.4 52.2,45.6 52.2,46.35 P1.P7
TX_N: J2.1 P1.P2 | length 24
  Bottom Layer w0.165: P1.P2 44.76,44.9 44.624,44.9 44,44.276 44,38.024 48.224,33.8 54.9,33.8 55.46,33.24 55.46,32.62 J2.1@56.58,31.5
TX_P: J2.2 P1.P1 | length 24.5
  Bottom Layer w0.165: P1.P1 44.28,44.98 43.7,44.4 43.7,37.9 48.1,33.5 54.776,33.5 55.16,33.116 55.16,32.62 J2.2@54.04,31.5
VBUS: J6.1 LD4.1 U5.40 | length 81.5
  Top Layer w0.5: J6.1 37.97,58.13 38.5,57.6 38.5,33 43,28.5 v3(43,12.4) ; v3(54.6,10.5) 55.7,9.4 60.1,9.4 60.9,8.6 60.9,2.2 60.4,1.7 LD4.1 LD4.1@59.4,1.7
  Bottom Layer w0.5: U5.40@31.89,58.13 J6.1 ; v3(43,12.4) 44.1,11.3 53.8,11.3 v3(54.6,10.5)
VIN1+: D6.AC1 D8.2 L5.2 | length 30.6
  Top Layer w0.8: L5.2 54.5,38.4 54.998,37.902 58.202,37.902 60.402,40.102 60.402,44.502 65.5,49.6 65.5,52.1 66.69,53.29 D8.2 70.89,53.29 71.8,54.2 D6.AC1
VIN1-: D6.AC2 D8.1 L6.2 | length 30.6
  Top Layer w0.8: L6.2 57.811,39.111 59.2,40.5 59.2,45 64.3,50.1 64.3,55.2 66.81,57.71 D8.1 70.79,57.71 71.7,56.8 D6.AC2
VIN2+: D2.AC1 D7.2 L3.2 | length 34.5
  Top Layer w0.8: L3.2 47.995,38.305 50.802,35.498 59.198,35.498 62.806,39.106 62.806,43.506 64.59,45.29 D7.2 70.99,45.29 71.9,46.2 D2.AC1
VIN2-: D2.AC2 D7.1 L4.2 | length 33.3
  Top Layer w0.8: L4.2 50,38.3 51.6,36.7 58.7,36.7 61.604,39.604 61.604,44.004 67.31,49.71 D7.1 70.99,49.71 71.9,48.8 D2.AC2
VSYS: C15.2 C16.2 C19.2 D9.2 J1.1 J6.2 R18.1 U4.1 U5.39 | length 1.1
  Top Layer w0.5: R18.1 v3(74.4,15.5)
  other v1: 66.4,1.4 67.4,1.4 66.4,2.4 67.4,2.4 66.4,3.4 67.4,3.4
pads on no net: J4.4 L1.5 L1.6 P1.

## Polygon pours and split planes (outlines as drawn)
GND on Bottom Layer "NONET_L-01_P-001" (solid, remove dead copper, pour order 0): 100,27 79,27 79,16.5 62,16.5 62,60 0,60 0,0 100,0
GND on Top Layer "NONET_L-01_P-001" (solid, remove dead copper, pour order 1): 100,27 79,27 79,16.5 62,16.5 62,60 0,60 0,0 100,0
VSYS on Internal Plane 2 (Vcc) (split plane): 4,59.49 41.8,59.49 41.8,42.752 34.75,42.752 34.685,42.744 34.624,42.718 34.572,42.678 34.532,42.626 34.506,42.565 34.498,42.5 34.498,4.25 34.506,4.185 34.532,4.124 34.572,4.072 34.624,4.032 34.685,4.006 34.75,3.998 66.25,3.998 66.315,4.006 66.376,4.032 66.428,4.072 66.468,4.124 66.494,4.185 66.502,4.25 66.502,16.5 79,16.5 79,27 99.49,27 99.49,4 99.491,3.984 99.483,3.751 99.456,3.503 99.412,3.258 99.35,3.016 99.272,2.78 99.176,2.55 99.065,2.327 98.937,2.112 98.795,1.908 98.639,1.713 98.469,1.531 98.287,1.361 98.092,1.205 97.888,1.063 97.673,0.935 97.45,0.824 97.22,0.728 96.984,0.65 96.742,0.588 96.497,0.544 96.249,0.517 96.016,0.509 96,0.51 4,0.51 3.984,0.509 3.751,0.517 3.503,0.544 3.258,0.588 3.016,0.65 2.78,0.728 2.55,0.824 2.327,0.935 2.112,1.063 1.908,1.205 1.713,1.361 1.531,1.531 1.361,1.713 1.205,1.908 1.063,2.112 0.935,2.327 0.824,2.55 0.728,2.78 0.65,3.016 0.588,3.258 0.544,3.503 0.517,3.751 0.509,3.984 0.51,4 0.51,56 0.509,56.016 0.517,56.249 0.544,56.497 0.588,56.742 0.65,56.984 0.728,57.22 0.824,57.45 0.935,57.673 1.063,57.888 1.205,58.092 1.361,58.287 1.531,58.469 1.713,58.639 1.908,58.795 2.112,58.937 2.327,59.065 2.55,59.176 2.78,59.272 3.016,59.35 3.258,59.412 3.503,59.456 3.751,59.483 3.984,59.491
3V3 on Internal Plane 2 (Vcc) (split plane): 62,16.5 65.998,16.5 65.998,4.502 35.002,4.502 35.002,42.248 41.8,42.248 41.8,42.1 58.2,42.1 58.2,59.49 62,59.49
GND on Internal Plane 1 (Gnd) (split plane): 4,59.49 41.8,59.49 41.8,42.1 58.2,42.1 58.2,59.49 62,59.49 62,16.5 79,16.5 79,27 99.49,27 99.49,4 99.491,3.984 99.483,3.751 99.456,3.503 99.412,3.258 99.35,3.016 99.272,2.78 99.176,2.55 99.065,2.327 98.937,2.112 98.795,1.908 98.639,1.713 98.469,1.531 98.287,1.361 98.092,1.205 97.888,1.063 97.673,0.935 97.45,0.824 97.22,0.728 96.984,0.65 96.742,0.588 96.497,0.544 96.249,0.517 96.016,0.509 96,0.51 4,0.51 3.984,0.509 3.751,0.517 3.503,0.544 3.258,0.588 3.016,0.65 2.78,0.728 2.55,0.824 2.327,0.935 2.112,1.063 1.908,1.205 1.713,1.361 1.531,1.531 1.361,1.713 1.205,1.908 1.063,2.112 0.935,2.327 0.824,2.55 0.728,2.78 0.65,3.016 0.588,3.258 0.544,3.503 0.517,3.751 0.509,3.984 0.51,4 0.51,56 0.509,56.016 0.517,56.249 0.544,56.497 0.588,56.742 0.65,56.984 0.728,57.22 0.824,57.45 0.935,57.673 1.063,57.888 1.205,58.092 1.361,58.287 1.531,58.469 1.713,58.639 1.908,58.795 2.112,58.937 2.327,59.065 2.55,59.176 2.78,59.272 3.016,59.35 3.258,59.412 3.503,59.456 3.751,59.483 3.984,59.491

## Keep-outs
Keep-Out Layer:
  the board outline again, w0.2
  text ".Layer_Name" at 9.398,66 h1.52

## Other copper
Top Layer:
  pour cut-out: 57.453,30.447 48.579,30.447 48.579,31.979 48.7,32.1 56.8,32.1 57.453,31.447
  pour cut-out: 62.2,60 62.2,54.8 59,54.8 59,60
  region net NetC7_2: 76.6,18.5 77,18.9 77,29.6 76.6,30 64.4,30 64,29.6 64,19 64.5,18.5
  region net +VIN: 90.432,46.9 90.832,47.3 93.3,47.3 93.7,46.9 93.7,41.5 93.4,41.2 91.6,41.2 91.3,41.5 91.3,43.4 90.822,43.878 90.432,43.878 90.432,45.122
  region net NetC7_2: 70.49,35.85 70.99,35.35 70.99,30.51 71.6,29.9 68.1,29.9 68.72,30.52 68.72,35.35 69.22,35.85
  region net NetC7_2: 71.35,40.75 71.59,40.51 71.59,39.855 74.546,39.855 75.09,40.4 77.125,40.4 77.125,42.775 76.65,43.25 67.75,43.25 65.378,40.878 65.378,39.432 66.622,39.432 67.94,40.75
  region net NetC7_2: 86.3,41.2 86,41.5 86,46.9 86.4,47.3 89.9,47.3 89.9,45.454 89.568,45.122 89.568,43.878 89.178,43.878 88.7,43.4 88.7,41.5 88.4,41.2
  region net NetD5_1: 90,48.1 91.4,48.1 92,48.7 92,53.3 90.75,54.55 89.05,54.55 89.05,52.05 90,51.1
  region net NetD5_2: 88.8,56.132 90.75,56.132 90.75,58.5 86.6,58.5 86.078,57.978 86.078,56.132
  region net -VIN: 81.9,58.2 79.2,58.2 78.825,57.825 78.825,56.4 81.9,56.4 82.3,56.8 82.3,57.8
  region net +VIN: 85.7,52.8 86,52.5 86,51.9 87.4,51.9 87.4,55.3 86,55.3 86,54.9 85.7,54.6 78.825,54.6 78.825,53.175 79.2,52.8
  region net +VIN: 81.9,44.8 79.2,44.8 78.825,45.175 78.825,46.6 81.9,46.6 82.3,46.2 82.3,45.2
  region net -VIN: 85.8,50.2 86,50.4 86,51.1 87.4,51.1 89,51.1 89,48.1 88.15,48.1 87.85,48.4 78.825,48.4 78.825,49.825 79.2,50.2
  region net GND: 62,55.45 61.65,55.1 61.3,55.1 59.55,55.1 59.2,55.45 59.2,59 59.5,59.3 61.6,59.3 62,58.9
  region net GND: 85.5,1.8 91.9,1.8 91.9,6.1 89.1,6.1 89.1,4.9 85.5,4.9
  region net GND: 78.6,4.3 83.4,4.3 83.4,0.5 78.6,0.5
  region net GND: 91.9,27 91.9,20.4 92.6,19.7 97.5,19.7 97.5,22.98 96,24.48 96,27
  region net NetD1_1: 90.6,26.8 90.6,24.88 91.3,24.18 91.3,21.2 86.1,21.2 85.6,21.7 85.6,26.2 86.2,26.8
  region net GND: 97.3,9.7 97.3,13.4 99.49,13.4 99.49,9.7
  region net NetC3_2: 92.5,10 92,10.5 92,12.4 91.7,12.7 88,12.7 87.7,13 87.7,16.7 88.2,17.2 96,17.2 96.4,16.8 96.4,10.5 95.9,10
  region net 5V: 91.2,12 91.1,12.1 78.1,12.1 73.4,12.1 72.8,11.5 72.8,8.3 73.3,7.8 85.75,7.8 86.45,7.1 91.2,7.1
  region net GND: 75.6,7.3 76,6.9 76,1 73.15,1 73.15,7.3
  region net GND: 72.855,14.3 73.255,14.7 73.6,14.7 78.5,14.7 78.5,12.9 72.855,12.9
  region net 3V3: 62.2,4.6 61.8,5 61.8,6 62.2,6.4 65.5,6.4 65.9,6 65.9,5 65.5,4.6
  region net VSYS: 64.5,3.8 66.8,3.8 67.2,4.2 67.2,10.7 68.35,11.85 68.35,13.825 71.975,13.825 72.1,13.7 72.1,11.1 70.8,9.8 70.8,1.35 70.45,1 64.6,1 64.2,1.4 64.2,3.5
  region net GND: 62.3,11.4 62.3,15.91 63.1,15.91 63.1,11.4
  region net 3V3: 64.3,11 63.9,11.4 63.9,13.7 64.025,13.825 67.65,13.825 67.65,12.05 66.6,11
  region net CGND: 59.55,48.65 61.7,50.8 61.7,52.8 59.5,52.8 59.5,51.6 58.8,50.9 42.185,50.9 42.185,48.65
  text ".Layer_Name" at 9.398,66 h1.52
Bottom Layer:
  pour cut-out: 56.664,30.438 60.287,30.438 61.082,31.234 60.916,31.4 56.9,31.4 56.9,30.674
  pour cut-out: 46.504,30.438 53.956,30.438 53.956,32.562 46.504,32.562
  region net NetC7_2: 65,30.8 64,29.8 64,19 64.5,18.5 65.6,18.5 76.6,18.5 77,18.9 77,29.6 76.6,30 70.1,30 69.3,30.8 69.3,39 70,39.7 76.3,39.7 78.6,42 84.8,42 87.8,45 87.8,46.9 87.4,47.3 86.4,47.3 86,46.9 86,46.1 84.2,44.3 68.8,44.3 65,40.5
  region net +VIN: 85.7,50.2 85,50.9 85,50.2 85,47.7 85.7,48.4 91.5,48.4 91.9,48 91.9,45.9 92.3,45.5 93.3,45.5 93.7,45.9 93.7,49 92.5,50.2
  region net +VIN: 80.9,44.8 83.8,44.8 85.3,46.3 85.3,53.1 83.8,54.6 80.9,54.6 80.5,54.2 80.5,53.2 80.9,52.8 82.9,52.8 83.3,52.4 83.3,47.1 82.8,46.6 80.9,46.6 80.5,46.2 80.5,45.2
  region net -VIN: 81.9,48.4 79,48.4 77.5,49.9 77.5,56.7 79,58.2 81.9,58.2 82.3,57.8 82.3,56.8 81.9,56.4 79.9,56.4 79.5,56 79.5,50.7 80,50.2 81.9,50.2 82.3,49.8 82.3,48.8
  region net 3V3: 62.2,4.6 61.8,5 61.8,6 62.2,6.4 65.5,6.4 65.9,6 65.9,5 65.5,4.6
  region net 3V3: 64.3,11 63.9,11.4 63.9,12.4 64.3,12.8 65.3,12.8 65.7,12.4 65.7,11.4 65.3,11 65.2,11
  text ".Layer_Name" at 9.398,66 h1.52
Internal Plane 1 (Gnd) (plane layer: these items are gaps in the copper):
  pour cut-out: 100,56 ccw(c96,56) 96,60 62,60 62,16.5 79,16.5 79,27 100,27
  pour cut-out: 41.8,42.1 58.2,42.1 58.2,60 41.8,60
  text ".Layer_Name" at 9.298,66.055 h1.52
Internal Plane 2 (Vcc) (plane layer: these items are gaps in the copper):
  pour cut-out: 100,56 ccw(c96,56) 96,60 62,60 62,16.5 79,16.5 79,27 100,27
  pour cut-out: 41.8,42.1 58.2,42.1 58.2,60 41.8,60
  lines w0.5: 42.25,42.5 34.75,42.5 34.75,4.25 66.25,4.25 66.25,16.5
  text ".Layer_Name" at 9.298,66.055 h1.52
Multi-Layer:
  pour cut-out: 58.2,60 58.2,42.1 41.8,42.1 41.8,60

## Silkscreen, mask and mechanical layers (free items; w line width, h text height)
Top Overlay:
  drawing of 32 lines, arcs and shapes, not listed
  text ".Layer_Name" at 9.398,66.032 h1.52
  text "WizPoE-IO-V001" at 6.229,33.25 h2 r90
Bottom Overlay:
  text ".Layer_Name" at 9.398,66 h1.52
Top Paste:
  text ".Layer_Name" at 9.398,66 h1.52
Bottom Paste:
  text ".Layer_Name" at 9.398,66 h1.52
Top Solder:
  text ".Layer_Name" at 9.398,66 h1.52
Bottom Solder:
  text ".Layer_Name" at 9.398,66 h1.52
Drill Guide:
  text ".Layer_Name" at 9.398,66 h1.52
Mechanical 1:
  lines w0.2: 174.1,7.7 ccw(c174.1,8.7) 175.1,8.7 ; 174.1,56.7 cw(c174.1,55.7) 175.1,55.7
Mechanical 2:
  region: 131.75,10 131.75,8.5 146.5,8.5 146.5,10
  region: 131.75,13 131.75,11.5 146.5,11.5 146.5,13
  lines w0.127: 102.5,24.9 102.5,4.775 ccw(c103.211,4.775) 103.211,4.064 147.389,4.064 ccw(c147.389,4.775) 148.1,4.775 148.1,24.9 ; 102.5,24.903 cw(c103.211,24.903) 103.211,25.614 147.389,25.614 cw(c147.389,24.903) 148.1,24.903 ; 103.5,18 147,18
  lines w0.2: 0,4 ccw(c4,4) 4,0 96,0 ccw(c96,4) 100,4 100,56 ccw(c96,56) 96,60 4,60 ccw(c4,56) 0,56 0,4
  text "BOARD NAME : WizPoE-IO-V001" at 0,77.176 h1.52
  text "VERSION : V001" at 0,74.382 h1.52
  text "SIZE : 100mmX60mmX1.6T" at 0,71.588 h1.52
  text "GERBER DATE : 2023. 01. 18." at 0,68.794 h1.52
  text "LAYER :" at 0,66 h1.52
  text "Layer Stack Up Detail for:" at 103.9,23.5 h1.02
  text "WizPoE-IO-V001.PcbDoc" at 104,21 h1.2
  text "Layer Name : 4L  1.6T" at 103.973,19.018 h1.02
  text "100 Ohm" at 136,19 h1.02
  text "01.Top Layer" at 104,14.5 h1.52
  text "0.165 / 0.135" at 132,14.5 h1.52
  text "02.Internal Plane 1 (Gnd)" at 104,11.5 h1.52
  text "03.Internal Plane 2 (Vcc)" at 104,8.5 h1.52
  text "04.Bottom Layer" at 104,5.5 h1.52
  text "0.165 / 0.135" at 132,5.5 h1.52
  text "KS Technology artwork" at 102.5,0 h5.08
Drill Drawing:
  text ".Layer_Name" at 9.398,66 h1.52
  text ".Legend" at 103.5,27.15 h1.02

## Dimensions
-0.5,0 to -0.5,60 on Mechanical 2
100,-0.5 to 0,-0.5 on Mechanical 2

## Text inside footprints (layer, text, board x,y; h text height)
D2: Top Overlay "~" at 72.883,49.109 h1 r90; Top Overlay "~" at 72.883,46.509 h1 r90; Top Overlay "-" at 80.522,49.228 h1 r270; Top Overlay "+" at 80.522,46.628 h1 r270
D6: Top Overlay "+" at 80.522,54.628 h1 r270; Top Overlay "-" at 80.522,57.228 h1 r270; Top Overlay "~" at 72.883,54.509 h1 r90; Top Overlay "~" at 72.883,57.109 h1 r90
P1: Top Overlay "P13" at 44.5,55.25 h0.76; Top Overlay "P10" at 55.75,45.25 h0.76; Top Overlay "P9" at 55.75,46.5 h0.76; Top Overlay "P2" at 43.25,43.5 h0.76; Top Overlay "P14" at 44.5,57 h0.76; Top Overlay "P11" at 53.75,55.25 h0.76; Top Overlay "P12" at 53.75,57 h0.76